# Altium PCB Gateway-Device-v1.0.PcbDoc (part 2 of 4)
Units mil, origin at the board's own origin, x right, y up, seen from the top; angles counter-clockwise.
Board outline 1968.5 x 3149.61 mil, 4 copper layers (Top Layer, Ground, Power, Bottom Layer), stack 61.654 mil thick; 142 components, 90 nets, 467 pads, 780 vias.
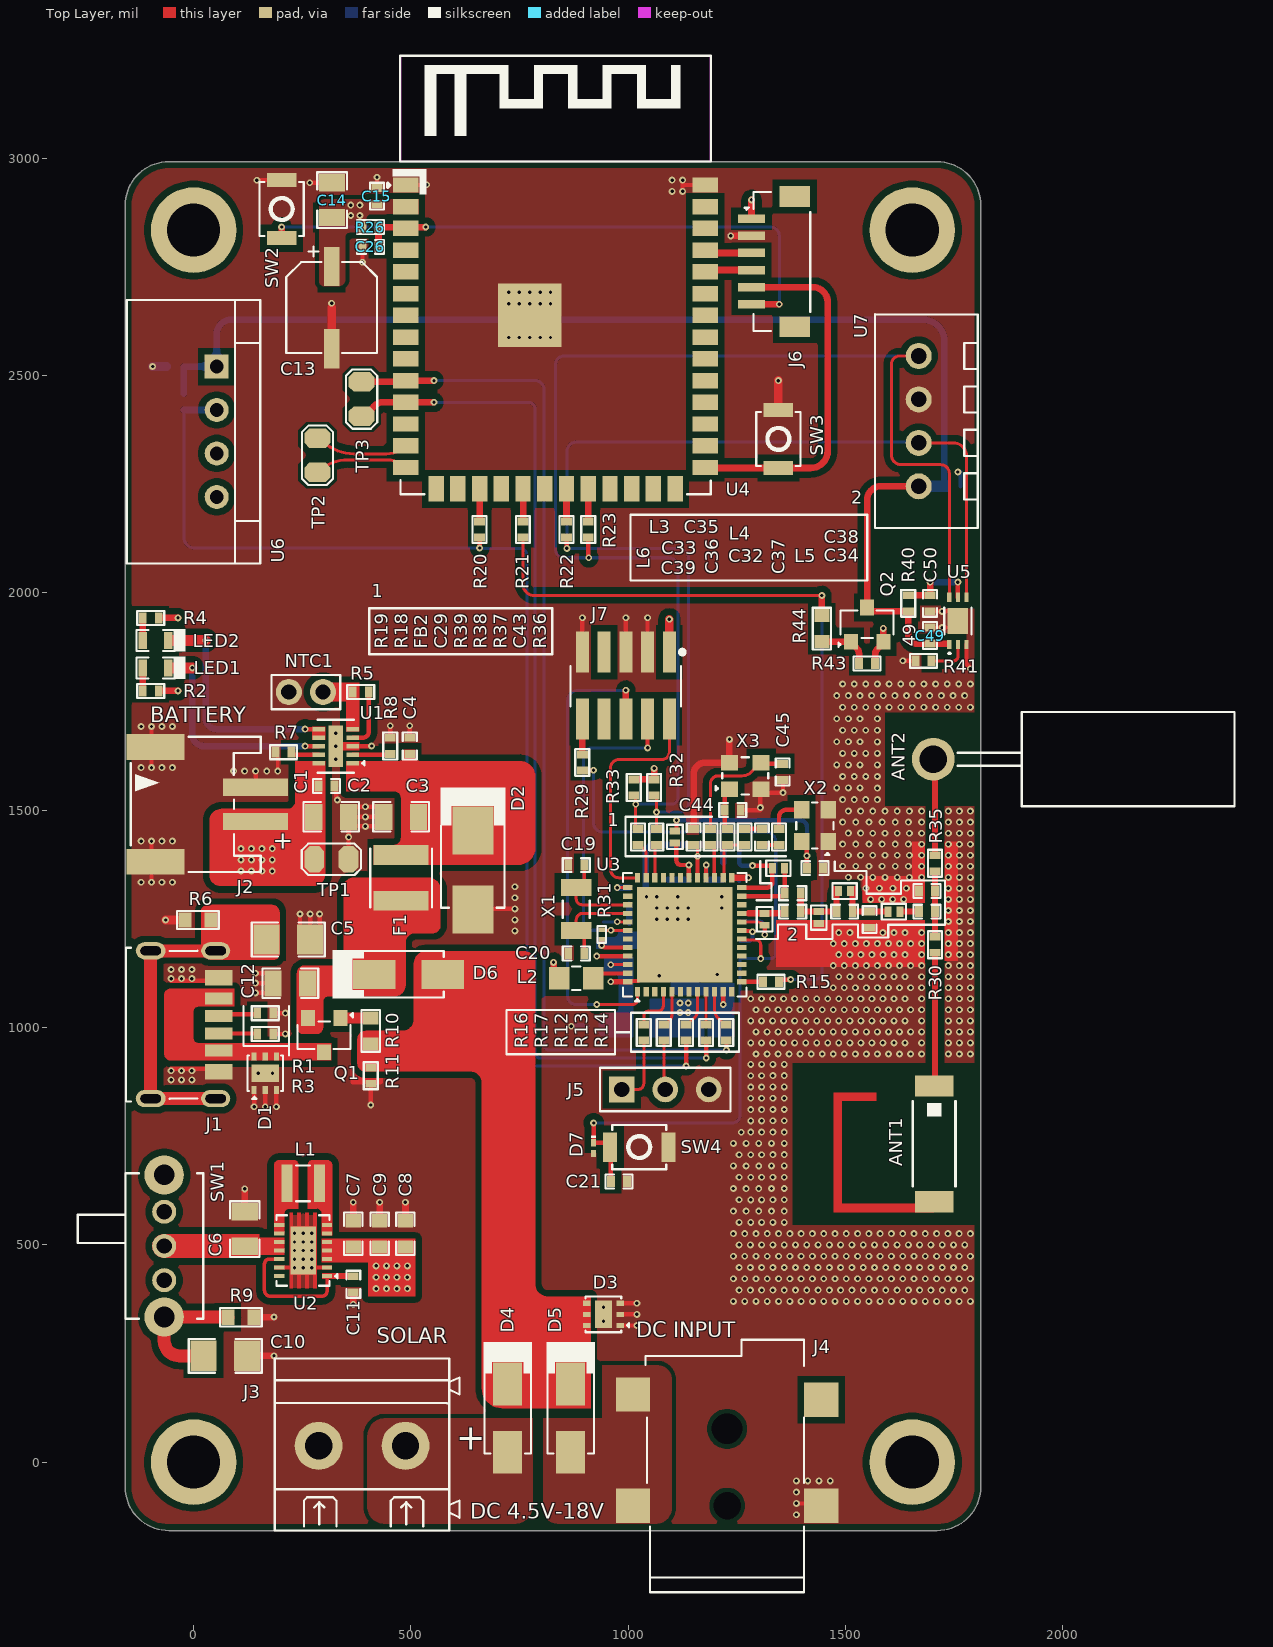
[diagram p0: Top Layer view]

## Part data (continued)
C43: library part GRM1555C1H100JA01D, "CAP CER 10PF 50V C0G/NP0 0402", Case Code (Imperial)=0402, Case Code (Metric)=1005, Dielectric=C0G, LCSC Part Number=C76946, Manufacturer=Murata, Max Operating Temperature=125°C, Min Operating Temperature=-55°C, Package Quantity=1, Tolerance=5%, Voltage=50V, Case/Package=0402, Category="Ceramic Capacitors", ComponentLink1Description=https://datasheet.ciiva.com/2989/product-2989280.pdf?src-supplier=Avnet, ComponentLink1URL=https://datasheet.ciiva.com/2989/product-2989280.pdf?src-supplier=Avnet, ComponentLink2Description=https://datasheet.ciiva.com/18184/getdatasheetpartid-307234-18184164.pdf?src-supplier=Verical, ComponentLink2URL=https://datasheet.ciiva.com/18184/getdatasheetpartid-307234-18184164.pdf?src-supplier=Verical, ComponentLink3Description=https://datasheet.ciiva.com/29200/453545-da-01-en-vs-kondensator-0402-29200107.pdf?src-supplier=Conrad, ComponentLink3URL=https://datasheet.ciiva.com/29200/453545-da-01-en-vs-kondensator-0402-29200107.pdf?src-supplier=Conrad, ComponentLink4Description=https://datasheet.ciiva.com/7828/1666664-7828812.pdf?src-supplier=Element14, ComponentLink4URL=https://datasheet.ciiva.com/7828/1666664-7828812.pdf?src-supplier=Element14, ComponentLink5Description=https://datasheet.ciiva.com/6271/partnumbering-e-01-6271159.pdf?src-supplier=Digi-Key, ComponentLink5URL=https://datasheet.ciiva.com/6271/partnumbering-e-01-6271159.pdf?src-supplier=Digi-Key, ComponentLink6Description=https://datasheet.ciiva.com/6271/partnumbering-e-01-6271158.pdf?src-supplier=Digi-Key, ComponentLink6URL=https://datasheet.ciiva.com/6271/partnumbering-e-01-6271158.pdf?src-supplier=Digi-Key, ComponentLink7Description=https://datasheet.ciiva.com/6271/partnumbering-e-01-6271068.pdf?src-supplier=Digi-Key, ComponentLink7URL=https://datasheet.ciiva.com/6271/partnumbering-e-01-6271068.pdf?src-supplier=Digi-Key, Construction=Flat, Depth=0.5mm, Height=0.5mm, Item Type=Capacitor, Lead Free="Lead Free", Length=1mm, Manufacturer Part Number=GRM1555C1H100JA01D, Material=Ceramic, Mounting Technology="Surface Mount", Packaging="Tape and Reel", Pricing="10000=0.0034, 50000=0.0027, 100000=0.0023, 250000=0.0021 (USD)", Radiation Hardening=No, Reach SVHC Compliant=No, RoHS=Yes, RoHS Compliant=Yes, Series=GRM, Stock=3860000, Supplier="Arrow Electronics", Supplier Part Number=GRM1555C1H100JA01D, Termination=SMD/SMT, Thickness=0.022inch, Voltage Rating=50V, Voltage Rating (DC)=50V, Width=0.02inch
C44 C45: library part CQ0402CRNPO9BN9R0, "CAP CER 9PF 50V C0G/NPO 0402", Case/Package=0402, LCSC Part Number=C577403, Manufacturer=Yageo, Max Operating Temperature=125°C, Min Operating Temperature=-55°C, Supplier Part Number=CQ0402CRNPO9BN9R0-ND, Voltage Rating=50V, Category="Ceramic Capacitors", ComponentLink1Description=http://www.yageo.com/documents/recent/UPY-High%20Q_NP0_16V-to-250V_13.pdf?src-supplier=Digikey, ComponentLink1URL=http://www.yageo.com/documents/recent/UPY-High%20Q_NP0_16V-to-250V_13.pdf?src-supplier=Digikey, Item Type=Capacitor, Manufacturer Part Number=CQ0402CRNPO9BN9R0, Mounting Technology="Surface Mount", Packaging="Tape and Reel", Pricing="10000=0.02594 (USD)", RoHS=Yes, Series=CQ, Supplier=Digikey
C46: library part GJM1555C1H4R3BB01D, "CAP CER 4.3PF 50V C0G/NP0 0402", Case Code (Imperial)=0402, Case Code (Metric)=1005, Dielectric=C0G, LCSC Part Number=C426034, Manufacturer=Murata, Max Operating Temperature=125°C, Min Operating Temperature=-55°C, Package Quantity=1, Temperature Coefficient=30ppm/°C, Voltage Rating=50V, Case/Package=0402, ComponentLink1Description=https://datasheet.ciiva.com/11613/product-11613476.pdf?src-supplier=Avnet, ComponentLink1URL=https://datasheet.ciiva.com/11613/product-11613476.pdf?src-supplier=Avnet, ComponentLink2Description=https://datasheet.ciiva.com/29536/partnumbering-e-01-29536086.pdf?src-supplier=Digikey, ComponentLink2URL=https://datasheet.ciiva.com/29536/partnumbering-e-01-29536086.pdf?src-supplier=Digikey, ComponentLink3Description=https://datasheet.ciiva.com/29536/partnumbering-e-01-29536085.pdf?src-supplier=Digikey, ComponentLink3URL=https://datasheet.ciiva.com/29536/partnumbering-e-01-29536085.pdf?src-supplier=Digikey, Construction=Flat, Depth=0.5mm, Height=0.5mm, Item Type=Capacitors, Length=1mm, Manufacturer Part Number=GJM1555C1H4R3BB01D, Material=4241ConductorMaterial, Mounting Technology="Surface Mount", Packaging="Tape and Reel", Pricing="1=0.1, 10=0.05, 50=0.05, 100=0.03, 1000=0.021, 10000=0.011 (USD)", Radiation Hardening=No, RoHS=Yes, RoHS Compliant=Yes, Series=GJM, Stock=11754, Supplier=Mouser, Termination=SMD/SMT, Thickness=0.022inch, Voltage Rating (DC)=50V, Width=0.02inch
D1: "9.5V 400W 7.5V 5V WSON-6(2x2) ESD and Surge Protection (TVS/ESD) ROHS", LCSC Part Number=C609571, Manufacturer="Texas Instruments", ComponentLink1Description=http://www.ti.com/lit/ds/symlink/tvs0500.pdf?src-supplier=Farnell, ComponentLink1URL=http://www.ti.com/lit/ds/symlink/tvs0500.pdf?src-supplier=Farnell, ComponentLink2Description=http://www.ti.com/lit/ds/symlink/tvs0500.pdf?src-supplier=Digikey, ComponentLink2URL=http://www.ti.com/lit/ds/symlink/tvs0500.pdf?src-supplier=Digikey, Item Type="TVS Diodes", Manufacturer Part Number=TVS0500DRVR, Pricing="1=0.51, 10=0.373, 100=0.254, 500=0.199, 1000=0.178 (USD)", RoHS=Yes, Stock=3745, Supplier=Digikey
D2: "Independent 5W 18V SMB Zener Diodes ROHS", LCSC Part Number=C18547762, Manufacturer=MSKSEMI, Package=SMB, ComponentLink1Description=LCSC, ComponentLink1URL=https://lcsc.com/product-detail/Zener-Diodes_MSKSEMI-SMBJ5355B-MS_C18547762.html, Item Type=Diode, Manufacturer Part Number=SMBJ5355B-MS
D3: "1 Surface Mount WSON-6(2x2) Surge Protection Devices (SPDs) ROHS", LCSC Part Number=C2649846, Manufacturer="Texas Instruments", ComponentLink1Description=http://www.ti.com/general/docs/suppproductinfo.tsp?distId=10&amp;gotoUrl=http%3A%2F%2Fwww.ti.com%2Flit%2Fgpn%2Ftvs1800&src-supplier=Digikey, ComponentLink1URL=http://www.ti.com/general/docs/suppproductinfo.tsp?distId=10&amp;gotoUrl=http%3A%2F%2Fwww.ti.com%2Flit%2Fgpn%2Ftvs1800&src-supplier=Digikey, Height=800um, Item Type="ESD Diode", Length=2mm, Manufacturer Part Number=TVS1800DRVR, Pins=6NUMBER, Pricing="1=0.5, 10=0.388, 50=0.388, 100=0.294, 1000=0.227, 10000=0.185 (USD)", RoHS=Yes, Stock=5073, Supplier=Mouser, Thickness=750um, Width=2mm
D4 D5 D6: "40V 500mV@2A 2A SMA(DO-214AC) Schottky Barrier Diodes (SBD) ROHS", LCSC Part Number=C2886579, Manufacturer="Guangdong Hottech", Package=SMA(DO-214AC), ComponentLink1Description=LCSC, ComponentLink1URL=https://www.lcsc.com/product-detail/Schottky-Barrier-Diodes-SBD_Guangdong-Hottech-SS24A_C2886579.html, Manufacturer Part Number=SS24A
D7: "TVS DIODE 3VWM ST0201", Breakdown Voltage=6.1V, Case Code (Imperial)=0201, Case Code (Metric)=0603, Clamping Voltage=12.2V, Leakage Current=100nA, Manufacturer=STMicroelectronics, Max Breakdown Voltage=8V, Max Operating Temperature=125°C, Max Power Dissipation=20W, Min Operating Temperature=-40°C, Peak Pulse Current=2A, Power Line Protection=No, Reverse Standoff Voltage=3V, Supplier Part Number=3110124, Test Current=1mA, Case/Package=0201, Category="TVS Diodes", ComponentLink1Description=https://datasheet.ciiva.com/1276/1684876-1276912.pdf?src-supplier=Element14, ComponentLink1URL=https://datasheet.ciiva.com/1276/1684876-1276912.pdf?src-supplier=Element14, ComponentLink2Description=https://datasheet.ciiva.com/4507/cd00212838-88488-4507763.pdf?src-supplier=Mouser, ComponentLink2URL=https://datasheet.ciiva.com/4507/cd00212838-88488-4507763.pdf?src-supplier=Mouser, ComponentLink3Description=https://datasheet.ciiva.com/16205/cd00212838-16205762.pdf?src-supplier=Future+Electronics, ComponentLink3URL=https://datasheet.ciiva.com/16205/cd00212838-16205762.pdf?src-supplier=Future+Electronics, ComponentLink4Description=https://datasheet.ciiva.com/15143/getdatasheetpartid-185245-15143908.pdf?src-supplier=Verical, ComponentLink4URL=https://datasheet.ciiva.com/15143/getdatasheetpartid-185245-15143908.pdf?src-supplier=Verical, ComponentLink5Description=https://datasheet.ciiva.com/22695/1684876-22695674.pdf?src-supplier=Element14, ComponentLink5URL=https://datasheet.ciiva.com/22695/1684876-22695674.pdf?src-supplier=Element14, ComponentLink6Description=https://datasheet.ciiva.com/337/cd00212838-337652.pdf?src-supplier=Digikey, ComponentLink6URL=https://datasheet.ciiva.com/337/cd00212838-337652.pdf?src-supplier=Digikey, ComponentLink7Description=https://datasheet.ciiva.com/337/cd00212838-337651.pdf?src-supplier=Digikey, ComponentLink7URL=https://datasheet.ciiva.com/337/cd00212838-337651.pdf?src-supplier=Digikey, ComponentLink8Description=https://datasheet.ciiva.com/337/cd00212838-337653.pdf?src-supplier=Digikey, ComponentLink8URL=https://datasheet.ciiva.com/337/cd00212838-337653.pdf?src-supplier=Digikey, ComponentLink9Description=https://datasheet.ciiva.com/11193/cd00212838-11193350.pdf?src-supplier=Avnet, ComponentLink9URL=https://datasheet.ciiva.com/11193/cd00212838-11193350.pdf?src-supplier=Avnet, ComponentLink10Description=https://datasheet.ciiva.com/41443/001184301-da-01-en-transil-sgl-un-esdalc6v1-1u2-st-0201-stm-41443159.pdf?src-supplier=Conrad, ComponentLink10URL=https://datasheet.ciiva.com/41443/001184301-da-01-en-transil-sgl-un-esdalc6v1-1u2-st-0201-stm-41443159.pdf?src-supplier=Conrad, Depth=0.3mm, Diode Type=ZENER, Direction=Unidirectional, ESD Protection=Yes, Height=0.33mm, Lead Free="Lead Free", Length=0.6mm, Manufacturer Part Number=ESDALC6V1-1U2, Max Reverse Leakage Current=100nA, Min Breakdown Voltage=6.1V, Mounting Technology="Surface Mount", Number of Channels=1, Number of Elements=1, Number of Unidirectional Channels=1, Packaging="Tape and Reel", Peak Pulse Power=20W, Pins=2, Polarity=Unidirectional, Power Dissipation=20W, Pricing="15000=0.0377, 45000=0.0364, 60000=0.0361, 150000=0.0351, 225000=0.0341 (USD)", Radiation Hardening=No, Reach SVHC Compliant=No, Reverse Breakdown Voltage=6.1V, RoHS=Yes, RoHS Compliant=Yes, Series="ESDA, TRANSIL™", Stock=405000, Supplier="Future Electronics", Termination=SMD/SMT, Width=0.35mm
F1: "24V 750mA 100A 1.5A 1210 Resettable Fuses ROHS", Current Rating=100A, LCSC Part Number=C207045, Manufacturer=Littlefuse, Supplier Part Number=F4146CT-ND, Voltage Rating=24V, Category="PTC Resettable Fuses", ComponentLink1Description=https://datasheet.ciiva.com/8005/littelfuse-ptc-1210l-8005372.pdf?src-supplier=Element14, ComponentLink1URL=https://datasheet.ciiva.com/8005/littelfuse-ptc-1210l-8005372.pdf?src-supplier=Element14, ComponentLink2Description=https://datasheet.ciiva.com/326/littelfuse-ptc-1210l-326060.pdf?src-supplier=Digikey, ComponentLink2URL=https://datasheet.ciiva.com/326/littelfuse-ptc-1210l-326060.pdf?src-supplier=Digikey, ComponentLink3Description=https://datasheet.ciiva.com/326/littelfuse-ptc-1210l-326061.pdf?src-supplier=Digikey, ComponentLink3URL=https://datasheet.ciiva.com/326/littelfuse-ptc-1210l-326061.pdf?src-supplier=Digikey, ComponentLink4Description=https://datasheet.ciiva.com/326/littelfuse-ptc-1210l-326062.pdf?src-supplier=Digikey, ComponentLink4URL=https://datasheet.ciiva.com/326/littelfuse-ptc-1210l-326062.pdf?src-supplier=Digikey, Height=1.8mm, Item Type=Fuse, Lead Free=5697LeadFree, Manufacturer Part Number=1210L075/24PR, Pricing="1=0.98, 5=0.81, 10=0.747, 50=0.6196, 100=0.5716, 250=0.51376, 500=0.47378, 1000=0.43676 (USD)", RoHS=Yes, Stock=2300, Supplier=Digikey
FB1: "500mΩ ±25% 600Ω@100MHz 0603 Ferrite Beads ROHS", Current Rating=350mA, DC Resistance (DCR)=500mR, LCSC Part Number=C141723, Manufacturer="Tai Tech", Height=800um, Impedance=600R, Item Type="Ferrite Bead", Length=1.6mm, Manufacturer Part Number=FCM1608KF-601T03, Number of Circuits=1NUMBER, Pricing="1=0.1, 10=0.02, 25=0.0176, 50=0.0158, 100=0.0142, 250=0.01236, 500=0.01106, 1000=0.00986 (USD)", Reach SVHC Compliant=4188SVHC, RoHS=No, Supplier=Digikey, Width=800um
FB2: "FERRITE BEAD 1 KOHM 0402 1LN", Case Code (Imperial)=0402, Case Code (Metric)=1005, Current Rating=250mA, DC Resistance (DCR)=1.1R, Frequency=100MHz, LCSC Part Number=C76889, Manufacturer=Murata, Max Operating Temperature=125°C, Min Operating Temperature=-55°C, Package Quantity=1, Tolerance=25%, Case/Package=0402, ComponentLink1Description=https://datasheet.ciiva.com/11799/0900766b811b5866-11799183.pdf?src-supplier=Rs, ComponentLink1URL=https://datasheet.ciiva.com/11799/0900766b811b5866-11799183.pdf?src-supplier=Rs, ComponentLink2Description=https://datasheet.ciiva.com/18089/getdatasheetpartid-153017-18089624.pdf?src-supplier=Verical, ComponentLink2URL=https://datasheet.ciiva.com/18089/getdatasheetpartid-153017-18089624.pdf?src-supplier=Verical, ComponentLink3Description=https://datasheet.ciiva.com/41449/001172203-da-01-en-drossel-0402-1000r-21-0x0-5mm-10000st-41449490.pdf?src-supplier=Conrad, ComponentLink3URL=https://datasheet.ciiva.com/41449/001172203-da-01-en-drossel-0402-1000r-21-0x0-5mm-10000st-41449490.pdf?src-supplier=Conrad, ComponentLink4Description=https://datasheet.ciiva.com/29347/442241-da-01-en-chip-drossel-0402-1000r-250ma-1-0x0-5mm-29347884.pdf?src-supplier=Conrad, ComponentLink4URL=https://datasheet.ciiva.com/29347/442241-da-01-en-chip-drossel-0402-1000r-250ma-1-0x0-5mm-29347884.pdf?src-supplier=Conrad, ComponentLink5Description=https://datasheet.ciiva.com/1466/5168-1466915.pdf?src-supplier=Element14, ComponentLink5URL=https://datasheet.ciiva.com/1466/5168-1466915.pdf?src-supplier=Element14, ComponentLink6Description=https://datasheet.ciiva.com/1466/5168-1466916.pdf?src-supplier=Element14, ComponentLink6URL=https://datasheet.ciiva.com/1466/5168-1466916.pdf?src-supplier=Element14, ComponentLink7Description=https://datasheet.ciiva.com/1012/l0110s0101blm15h-1012789.pdf?src-supplier=Digikey, ComponentLink7URL=https://datasheet.ciiva.com/1012/l0110s0101blm15h-1012789.pdf?src-supplier=Digikey, ComponentLink8Description=https://datasheet.ciiva.com/1012/l0110s0101blm15h-1012788.pdf?src-supplier=Digikey, ComponentLink8URL=https://datasheet.ciiva.com/1012/l0110s0101blm15h-1012788.pdf?src-supplier=Digikey, ComponentLink9Description=https://datasheet.ciiva.com/1012/l0110s0101blm15h-1012790.pdf?src-supplier=Digikey, ComponentLink9URL=https://datasheet.ciiva.com/1012/l0110s0101blm15h-1012790.pdf?src-supplier=Digikey, Core Material=Ferrite, DC Current=250mA, DC Resistance-Max=1.1R, Depth=0.5mm, ESR=1.1R, Height=0.5mm, Impedance=1kR, Item Type="Ferrite Beads", Lead Free=5697LeadFree, Length=1mm, Manufacturer Part Number=BLM15HG102SN1D, Material=Steel,Ferrite, Max Current Rating=250mA, Max DC Current=250mA, Military Standard=Not, Number of Circuits=1NUMBER, Number of Lines=1, Packaging="Tape and Reel", Pins=2, Pricing="10000=0.0226 (USD)", Radiation Hardening=No, Reach SVHC Compliant=No, RMS Current (Irms)=250mA, RoHS=Yes, RoHS Compliant=Yes, Series=BLM15H, Shielding=202Shielding, Stock=520000, Supplier="Arrow Electronics", Termination=SMD/SMT, Test Frequency=100MHz, Width=0.5mm
J1: "Receptacle USB - Type C 6 - USB Connectors ROHS", LCSC Part Number=C283540, Manufacturer="Koren Hroparts Elec", Manufacturer Part Number=Type-C-31-M-17, ComponentLink1Description=LCSC, ComponentLink1URL=https://www.lcsc.com/product-detail/USB-Connectors_Korean-Hroparts-Elec-TYPE-C-31-M-17_C283540.html, Item Type=Connector
J2: "CONN HEADER SMD R/A 2POS 2MM", Color=46,47Colour, Contact Resistance=20mR, Current Rating=3A, Flammability Rating="UL94 V-0", Housing Color=50Colour, Insulation Color=Natural, Insulation Resistance=1GR, LCSC Part Number=C295747, Manufacturer=JST, Max Current Rating=2A, Max Operating Temperature=85°C, Max Voltage Rating (AC)=100V, Min Operating Temperature=-25°C, ComponentLink1Description=http://www.farnell.com/datasheets/1699381.pdf?src-supplier=Farnell, ComponentLink1URL=http://www.farnell.com/datasheets/1699381.pdf?src-supplier=Farnell, ComponentLink2Description=http://datasheet.octopart.com/S2B-PH-SM4-TB-%28LF%29%28SN%29-JST-datasheet-12510261.pdf?src-supplier=Distrelec, ComponentLink2URL=http://datasheet.octopart.com/S2B-PH-SM4-TB-%28LF%29%28SN%29-JST-datasheet-12510261.pdf?src-supplier=Distrelec, ComponentLink3Description=http://www.farnell.com/datasheets/1699381.pdf?src-supplier=Newark, ComponentLink3URL=http://www.farnell.com/datasheets/1699381.pdf?src-supplier=Newark, ComponentLink4Description=https://datasheet.octopart.com/S2B-PH-SM4-TB%28LF%29%28SN%29-JST-datasheet-56537.pdf?src-supplier=Future+Electronics, ComponentLink4URL=https://datasheet.octopart.com/S2B-PH-SM4-TB%28LF%29%28SN%29-JST-datasheet-56537.pdf?src-supplier=Future+Electronics, ComponentLink5Description=http://www.farnell.com/datasheets/1699381.pdf?src-supplier=Element14, ComponentLink5URL=http://www.farnell.com/datasheets/1699381.pdf?src-supplier=Element14, ComponentLink6Description=https://datasheet.octopart.com/S2B-PH-SM4-TB-%28LF%29%28SN%29-JST-datasheet-12510261.pdf?src-supplier=TME, ComponentLink6URL=https://datasheet.octopart.com/S2B-PH-SM4-TB-%28LF%29%28SN%29-JST-datasheet-12510261.pdf?src-supplier=TME, Connector Type=Header, Contact Finish - Mating=TIN, Contact Material="Copper Alloy", Contact Mating Length=3.302mm, Contact Plating=154ConductorMaterial, Contact Shape=Square, Contact Type="Male Pin", Depth=7.6mm, Fastening Type=Detent, Gender=29Gender, Height=6mm, Housing Material=4302ConductorMaterial, Insulation Material=Nylon, Item Type=Connectors, Lead Free=5697LeadFree, Lead Pitch=2mm, Length=11.9mm, Manufacturer Part Number=S2B-PH-SM4-TB(LF)(SN), Mounting Technology="Surface Mount", Number of Contacts=2NUMBER, Number of Poles=2NUMBER, Number of Positions=2, Number of Rows=1, Orientation=5496OrientationType, Packaging="Cut Tape", Pins=2NUMBER, Pitch=2mm, Pricing="1000=0.27, 2000=0.265, 3000=0.265, 4000=0.26, 5000=0.25 (USD)", Reach SVHC Compliant=4186SVHC, RoHS=No, Series=PH, Stock=5000, Supplier="Future Electronics", Termination=Solder, Voltage Rating=100V, Voltage Rating (AC)=100V, Voltage Rating (DC)=100V, Weight=28.349523g, Width=2.34mm, Working Voltage=100V
J3: "1x2P 18A -40℃~+105℃ 250V Green 12~30 Straight 5.08mm 2.5 1 2 Plugin,P=5.08mm Screw terminal ROHS", LCSC Part Number=C395868, Manufacturer=DORABO, Package=Plugin,P=5.08mm, ComponentLink1Description=LCSC, ComponentLink1URL=https://www.lcsc.com/product-detail/Screw-terminal_DORABO-DB128L-5-08-2P-GN-S_C395868.html, Item Type="Terminal Block", Manufacturer Part Number=DB128L-5.08-2P-GN-S
J4: "Surface Mount DC Power Receptacle -20℃~+70℃ 2mm 6.4mm 2A 30V SMD AC/DC Power Connectors ROHS", LCSC Part Number=C720582, Manufacturer=XUNPU, Package=Custom, ComponentLink1Description=LCSC, ComponentLink1URL=https://www.lcsc.com/product-detail/AC-DC-Power-Connectors_XUNPU-DC-050-B200_C720582.html, Item Type="DC Jack", Manufacturer Part Number=DC-050-B200
J5: "Gold 250V 3A Straight Square Pins 2.5mm 3P 260℃ 6mm -40℃~+105℃ 3mm 2.54mm Plugin Black Brass 1x3P Plugin,P=2.54mm Pin Headers ROHS", LCSC Part Number=C706875, Manufacturer=XKB, Package=Plugin,P=2.54mm, ComponentLink1Description=LCSC, ComponentLink1URL=https://www.lcsc.com/product-detail/Pin-Headers_XKB-Connectivity-X6511WV-03H-C60D30_C706875.html, Item Type="Male Header", Manufacturer Part Number=X6511WV-03H-C60D30
J6: library part C145963, "1x6P SH 1 1mm 6 SMD,P=1mm Wire To Board / Wire To Wire Connector ROHS", Manufacturer=BOOMELE, Package=SMD,P=1mm, ComponentLink1Description=LCSC, ComponentLink1URL=https://www.lcsc.com/product-detail/Wire-To-Board-Wire-To-Wire-Connector_BOOMELE-Boom-Precision-Elec-C145963_C145963.html, Item Type=Connector, LCSC Part Number=C145963, Manufacturer Part Number=C145963
J7: "Gold 250V 1A Brick nogging Square Pins 1mm 10P 260℃ 4mm -40℃~+105℃ 1.27mm 双排 Black Brass 2x5P SMD,P=1.27mm Pin Headers ROHS", LCSC Part Number=C2881910, Manufacturer="XKB Connectivity", Package=SMD,P=1.27mm, ComponentLink1Description=LCSC, ComponentLink1URL=https://www.lcsc.com/product-detail/Pin-Headers_XKB-Connectivity-X1321WVS-2x05J-C40D53_C2881910.html, Item Type="Male Header", Manufacturer Part Number=X1321WVS-2x05J-C40D53
L1: library part DFE252012P-1R0M=P2, "FIXED IND 1UH 3.2A 0.042OHM SMD", Case Code (Imperial)=1008, Case Code (Metric)=2520, Current Rating=4.3A, DC Resistance (DCR)=42mR, Inductance Tolerance=20%, LCSC Part Number=C882955, Manufacturer=Murata, Manufacturer Part Number=DFE252012P-1R0M=P2, Max DC Current=3.2A, Max Operating Temperature=125°C, Min Operating Temperature=-40°C, Test Frequency=1MHz, Case/Package=1008, ComponentLink1Description=http://www.farnell.com/datasheets/2550134.pdf?src-supplier=Farnell, ComponentLink1URL=http://www.farnell.com/datasheets/2550134.pdf?src-supplier=Farnell, ComponentLink2Description=https://www.murata.com/~/media/webrenewal/products/inductor/chip/tokoproducts/wirewoundmetalalloychiptype/m_dfe252012p.ashx?src-supplier=Digikey, ComponentLink2URL=https://www.murata.com/~/media/webrenewal/products/inductor/chip/tokoproducts/wirewoundmetalalloychiptype/m_dfe252012p.ashx?src-supplier=Digikey, ComponentLink3Description=http://www.murata.com/~/media/webrenewal/products/inductor/chip/tokoproducts/wirewoundmetalalloychiptype/m_dfe252012p.ashx?src-supplier=Digikey, ComponentLink3URL=http://www.murata.com/~/media/webrenewal/products/inductor/chip/tokoproducts/wirewoundmetalalloychiptype/m_dfe252012p.ashx?src-supplier=Digikey, ComponentLink4Description=http://www.toko.co.jp/products/pdf/inductors/dfe252012p.pdf?src-supplier=Avnet, ComponentLink4URL=http://www.toko.co.jp/products/pdf/inductors/dfe252012p.pdf?src-supplier=Avnet, Core Material=Ferrite, Depth=2mm, ESR=42mR, Height=1.2mm, Height - Seated (Max)=0.039inch, Item Type=Inductor, Length=0.098inch, Mounting Technology="Surface Mount", Packaging="Cut Tape", Pricing="3000=0.103, 6000=0.1, 9000=0.0987, 12000=0.0976, 15000=0.0942 (USD)", RMS Current (Irms)=3.2A, RoHS=Yes, RoHS Compliant=Yes, Saturation Current=4.3A, Series=DFE252012P, Shielding=Shielded, Stock=30000, Supplier="Future Electronics", Tolerance=20%, Width=0.079inch
L2: library part MLZ2012M150WT000, "FIXED IND 15UH 250MA 950MOHM SMD", Case Code (Imperial)=0805, Case Code (Metric)=2012, DC Resistance (DCR)=950mR, LCSC Part Number=C383402, Manufacturer=TDK, Max Operating Temperature=125°C, Min Operating Temperature=-55°C, RMS Current (Irms)=250mA, Saturation Current=120mA, Self Resonant Frequency=40MHz, Test Frequency=2MHz, Tolerance=20%, Case/Package=0805, ComponentLink1Description=https://datasheet.ciiva.com/29690/inductor-commercial-decoupling-mlz-en-29690328.pdf?src-supplier=Digikey, ComponentLink1URL=https://datasheet.ciiva.com/29690/inductor-commercial-decoupling-mlz-en-29690328.pdf?src-supplier=Digikey, ComponentLink2Description=https://datasheet.ciiva.com/29690/inductor-commercial-decoupling-mlz-en-29690327.pdf?src-supplier=Digikey, ComponentLink2URL=https://datasheet.ciiva.com/29690/inductor-commercial-decoupling-mlz-en-29690327.pdf?src-supplier=Digikey, ComponentLink3Description=https://datasheet.ciiva.com/29690/inductor-commercial-decoupling-mlz-en-29690329.pdf?src-supplier=Digikey, ComponentLink3URL=https://datasheet.ciiva.com/29690/inductor-commercial-decoupling-mlz-en-29690329.pdf?src-supplier=Digikey, Core Material=Ferrite, ESR=1.235R, Height=1.45mm, Item Type="Fixed Inductors", Manufacturer Part Number=MLZ2012M150WT000, Mounting Technology="Surface Mount", Packaging="Cut Tape", Pricing="2000=0.0432, 10000=0.0391, 24000=0.037, 50000=0.0337 (USD)", RoHS=Yes, RoHS Compliant=Yes, Series=MLZ, Shielding=Shielded, Stock=144000, Supplier="Arrow Electronics"
L3: library part LQW15AN47NG00D, "FIXED IND 47NH 210MA 1.08OHM SMD", Case Code (Imperial)=0402, Case Code (Metric)=1005, Current=600mA, DC Current=210mA, DC Resistance (DCR)=1.08R, Inductance Tolerance=2%, LCSC Part Number=C22334, Manufacturer=Murata, Max Operating Temperature=125°C, Min Operating Temperature=-55°C, Package Quantity=1, Self Resonant Frequency=2.9GHz, Test Frequency=100MHz, Case/Package=0402, ComponentLink1Description=https://datasheet.ciiva.com/11799/0900766b8090d800-11799167.pdf?src-supplier=Rs, ComponentLink1URL=https://datasheet.ciiva.com/11799/0900766b8090d800-11799167.pdf?src-supplier=Rs, ComponentLink2Description=https://datasheet.ciiva.com/6709/l0075s0080lqw15a-00-6709897.pdf?src-supplier=Digikey, ComponentLink2URL=https://datasheet.ciiva.com/6709/l0075s0080lqw15a-00-6709897.pdf?src-supplier=Digikey, ComponentLink3Description=https://datasheet.ciiva.com/6709/l0075s0080lqw15a-00-6709899.pdf?src-supplier=Digikey, ComponentLink3URL=https://datasheet.ciiva.com/6709/l0075s0080lqw15a-00-6709899.pdf?src-supplier=Digikey, ComponentLink4Description=https://datasheet.ciiva.com/4976/product-4976502.pdf?src-supplier=Mouser, ComponentLink4URL=https://datasheet.ciiva.com/4976/product-4976502.pdf?src-supplier=Mouser, ComponentLink5Description=https://datasheet.ciiva.com/8507/l0075s0080lqw15a-00-8507529.pdf?src-supplier=Avnet, ComponentLink5URL=https://datasheet.ciiva.com/8507/l0075s0080lqw15a-00-8507529.pdf?src-supplier=Avnet, ComponentLink6Description=https://datasheet.ciiva.com/16455/l0075s0080lqw15a-00-16455878.pdf?src-supplier=Future+Electronics, ComponentLink6URL=https://datasheet.ciiva.com/16455/l0075s0080lqw15a-00-16455878.pdf?src-supplier=Future+Electronics, Core Material=Non-Magnetic,Air,Ferrite, Depth=0.6mm, ESR=1.08R, Height=0.5mm, Item Type="Fixed Inductors", Lead Free="Lead Free", Length=1mm, Manufacturer Part Number=LQW15AN47NG00D, Max DC Current=210mA, Military Standard=Not, Mounting Technology="Surface Mount", Packaging="Tape and Reel", Pins=2, Pricing="371=0.0431 (USD)", Q Factor=25, Reach SVHC Compliant=No, RMS Current (Irms)=210mA, RoHS=Yes, RoHS Compliant=Yes, Series=LQW15A_00, Shielding=Unshielded, Stock=371, Supplier="Arrow Electronics", Termination=SMD/SMT, Tolerance=2%, Weight=2.8E-05oz, Width=0.5mm
L4: library part LQW15AN3N3D10D, "FIXED IND 3.3NH 900MA 0.04OHM SM", Case Code (Imperial)=0402, Case Code (Metric)=1005, Current=800mA, Current Rating=900mA, DC Resistance (DCR)=40mR, LCSC Part Number=C98061, Manufacturer=Murata, Max Operating Temperature=125°C, Min Operating Temperature=-55°C, Package Quantity=1, Self Resonant Frequency=12GHz, Test Frequency=100MHz, Case/Package=0402, ComponentLink1Description=https://datasheet.ciiva.com/11799/0900766b8090d5c4-11799120.pdf?src-supplier=Rs, ComponentLink1URL=https://datasheet.ciiva.com/11799/0900766b8090d5c4-11799120.pdf?src-supplier=Rs, ComponentLink2Description=https://datasheet.ciiva.com/6705/l0075s0080lqw15a-10-6705512.pdf?src-supplier=Digikey, ComponentLink2URL=https://datasheet.ciiva.com/6705/l0075s0080lqw15a-10-6705512.pdf?src-supplier=Digikey, ComponentLink3Description=https://datasheet.ciiva.com/6705/l0075s0080lqw15a-10-6705511.pdf?src-supplier=Digikey, ComponentLink3URL=https://datasheet.ciiva.com/6705/l0075s0080lqw15a-10-6705511.pdf?src-supplier=Digikey, ComponentLink4Description=https://datasheet.ciiva.com/6705/l0075s0080lqw15a-10-6705513.pdf?src-supplier=Digikey, ComponentLink4URL=https://datasheet.ciiva.com/6705/l0075s0080lqw15a-10-6705513.pdf?src-supplier=Digikey, ComponentLink5Description=https://datasheet.ciiva.com/4976/product-4976988.pdf?src-supplier=Mouser, ComponentLink5URL=https://datasheet.ciiva.com/4976/product-4976988.pdf?src-supplier=Mouser, ComponentLink6Description=https://datasheet.ciiva.com/8506/l0075s0080lqw15a-10-8506007.pdf?src-supplier=Avnet, ComponentLink6URL=https://datasheet.ciiva.com/8506/l0075s0080lqw15a-10-8506007.pdf?src-supplier=Avnet, ComponentLink7Description=https://datasheet.ciiva.com/16455/l0075s0080lqw15a-10-16455870.pdf?src-supplier=Future+Electronics, ComponentLink7URL=https://datasheet.ciiva.com/16455/l0075s0080lqw15a-10-16455870.pdf?src-supplier=Future+Electronics, Core Material=Non-Magnetic,Air, DC Current=900mA, Depth=0.7mm, Height=0.5mm, Height - Seated (Max)=0.024inch, Item Type="Fixed Inductors", Lead Free="Lead Free", Length=1mm, Manufacturer Part Number=LQW15AN3N3D10D, Max Current Rating=900mA, Max DC Current=900mA, Military Standard=Not, Mounting Technology="Surface Mount", Packaging="Tape and Reel", Pins=2, Pricing="10000=0.0448 (USD)", Radiation Hardening=No, Reach SVHC Compliant=No, RoHS=Yes, RoHS Compliant=Yes, Series=LQW15A_10, Shielding=Unshielded, Stock=20000, Supplier="Arrow Electronics", Termination=SMD/SMT, Weight=2.8E-05oz, Width=0.02inch
L5: library part LQW15AN8N2G00D, "FIXED IND 8.2NH 540MA 0.14OHM SM", Case Code (Imperial)=0402, Case Code (Metric)=1005, DC Current=540mA, DC Resistance (DCR)=140mR, Inductance Tolerance=2%, LCSC Part Number=C84404, Manufacturer=Murata, Max Operating Temperature=125°C, Min Operating Temperature=-55°C, Package Quantity=1, Self Resonant Frequency=5.5GHz, Test Frequency=100MHz, Case/Package=0402, ComponentLink1Description=https://datasheet.ciiva.com/11799/0900766b8090d800-11799384.pdf?src-supplier=Rs, ComponentLink1URL=https://datasheet.ciiva.com/11799/0900766b8090d800-11799384.pdf?src-supplier=Rs, ComponentLink2Description=https://datasheet.ciiva.com/16455/l0075s0080lqw15a-00-16455832.pdf?src-supplier=Future+Electronics, ComponentLink2URL=https://datasheet.ciiva.com/16455/l0075s0080lqw15a-00-16455832.pdf?src-supplier=Future+Electronics, Core Material=Non-Magnetic,Ferrite, Depth=0.7mm, ESR=140mR, Height=0.5mm, Item Type="Fixed Inductors", Lead Free="Lead Free", Length=1mm, Manufacturer Part Number=LQW15AN8N2G00D, Max Current Rating=540mA, Max DC Current=540mA, Military Standard=Not, Mounting Technology="Surface Mount", Packaging="Tape and Reel", Pins=2, Pricing="1=0.11, 10=0.094, 50=0.094, 100=0.078, 1000=0.064, 10000=0.052 (USD)", Q Factor=25, Radiation Hardening=No, Reach SVHC Compliant=No, RMS Current (Irms)=540mA, RoHS=Yes, RoHS Compliant=Yes, Series=LQW15A_00, Shielding=Unshielded, Stock=47249, Supplier=Mouser, Termination=SMD/SMT, Tolerance=2%, Weight=2.8E-05oz, Width=0.5mm
L6: library part LQW15AN9N1G8ZD, "FIXED IND 9.1NH 1.4A 0.08OHM SMD", LCSC Part Number=C1330593, Manufacturer=Murata, ComponentLink1Description=https://search.murata.co.jp/Ceramy/image/img/P02/JELF243A-9138.pdf?src-supplier=Digikey, ComponentLink1URL=https://search.murata.co.jp/Ceramy/image/img/P02/JELF243A-9138.pdf?src-supplier=Digikey, ComponentLink2Description=https://datasheet.octopart.com/LQW15AN9N1G8ZD-Murata-datasheet-140317541.pdf?src-supplier=Farnell, ComponentLink2URL=https://datasheet.octopart.com/LQW15AN9N1G8ZD-Murata-datasheet-140317541.pdf?src-supplier=Farnell, Item Type="Fixed Inductors", Manufacturer Part Number=LQW15AN9N1G8ZD, Pricing="1=0.16, 10=0.134, 50=0.118, 100=0.111, 1000=0.091, 10000=0.074 (USD)", RoHS=Yes, Stock=16863, Supplier=Mouser
LED1: library part NCD0603R3, "RED LED 0603 Light Emitting Diodes", LCSC Part Number=C3151730, Manufacturer="Foshan NationStar Optoelectronics", Package=0603, ComponentLink1Description=LCSC, ComponentLink1URL=https://www.lcsc.com/product-detail/Light-Emitting-Diodes-LED_Foshan-NationStar-Optoelectronics-NCD0603R3_C3151730.html, Item Type=LED, Manufacturer Part Number=NCD0603R3
LED2: library part NCD0603G2, "Emerald 0603 Light Emitting Diodes (LED) ROHS", LCSC Part Number=C87326, Manufacturer="Foshan NationStar Optoelectronics", Package=0603, ComponentLink1Description=LCSC, ComponentLink1URL=https://www.lcsc.com/product-detail/Light-Emitting-Diodes-LED_Foshan-NationStar-Optoelectronics-NCD0603G2_C87326.html, Item Type=LED, Manufacturer Part Number=NCD0603G2
NTC1: library part "MF51B 103F3435", "10kΩ 50mW ±1% NTC Thermistors ROHS", LCSC Part Number=C394029, Manufacturer="Nanjing Shiheng Elec", ComponentLink1Description=LCSC, ComponentLink1URL=https://lcsc.com/product-detail/NTC-Thermistors_Nanjing-Shiheng-Elec-MF51B-103F3435_C394029.html, Item Type="NTC Thermistors", Manufacturer Part Number="MF51B 103F3435"
Q1: "MOSFET P-CH 30V 4.3A SOT23-3", LCSC Part Number=C3280149, Manufacturer="Alpha & Omega Semiconductor", Supplier Part Number=785-AOSS21311CCT-ND, Category=Transistors, Item Type=MOSFET, Manufacturer Part Number=AOSS21311C, Pricing="1=0.44, 10=0.314, 100=0.1582, 500=0.14016, 1000=0.10908 (USD)", RoHS=Yes, Stock=15013, Supplier=Digikey
Q2: "Trans Mosfet P-ch 30V 4A 3-PIN SOT-23 T/r", Case/Package=TO-236-3, Continuous Drain Current (ID)=4A, Drain to Source Voltage (Vdss)=30V, Input Capacitance=1.2nF, LCSC Part Number=C181091, Manufacturer="Alpha & Omega Semiconductor", Manufacturer Part Number=AO3401A, Max Operating Temperature=150°C, Max Power Dissipation=1.4W, Min Operating Temperature=-55°C, Category=MOSFETs, ComponentLink1Description=https://datasheet.ciiva.com/940/ao3401a-940720.pdf?src-supplier=Digi-Key, ComponentLink1URL=https://datasheet.ciiva.com/940/ao3401a-940720.pdf?src-supplier=Digi-Key, ComponentLink2Description=https://datasheet.ciiva.com/26927/getdatasheetpartid-79048-26927888.pdf?src-supplier=Verical, ComponentLink2URL=https://datasheet.ciiva.com/26927/getdatasheetpartid-79048-26927888.pdf?src-supplier=Verical, Item Type=Mosfet, Lead Free="Lead Free", Mount="Surface Mount", Number of Elements=1, Number of Pins=3, Packaging="Tape and Reel", Power Dissipation=1.4W, Radiation Hardening=No, Rds On Max=44mR, RoHS=Yes, RoHS Compliant=Yes, Series=-, Supplier 1="Arrow Electronics", Supplier Part Number 1=AO3401A
R1 R3: library part RC0402FR-075K1L, "RES 5.1K OHM 1% 1/16W 0402", Case Code (Imperial)=0402, Case Code (Metric)=1005, LCSC Part Number=C105872, Manufacturer=Yageo, Max Operating Temperature=155°C, Max Power Dissipation=63mW, Min Operating Temperature=-55°C, Package Quantity=1, Resistance=5.1kR, Resistance Tolerance=1%, Resistor Type="Thick Film", Temperature Coefficient=100ppm/°C, Voltage Rating=50V, Case/Package=0402, Category="Chip SMD Resistors", ComponentLink1Description=https://datasheet.ciiva.com/7983/1018594-7983519.pdf?src-supplier=Element14, ComponentLink1URL=https://datasheet.ciiva.com/7983/1018594-7983519.pdf?src-supplier=Element14, ComponentLink2Description=https://datasheet.ciiva.com/46394/1018594-46394936.pdf?src-supplier=Element14, ComponentLink2URL=https://datasheet.ciiva.com/46394/1018594-46394936.pdf?src-supplier=Element14, ComponentLink3Description=https://datasheet.ciiva.com/2453/pyu-r-int-thick-7-2453401.pdf?src-supplier=Digi-Key, ComponentLink3URL=https://datasheet.ciiva.com/2453/pyu-r-int-thick-7-2453401.pdf?src-supplier=Digi-Key, ComponentLink4Description=https://datasheet.ciiva.com/2453/pyu-r-int-thick-7-2453402.pdf?src-supplier=Digi-Key, ComponentLink4URL=https://datasheet.ciiva.com/2453/pyu-r-int-thick-7-2453402.pdf?src-supplier=Digi-Key, ComponentLink5Description=https://datasheet.ciiva.com/2453/pyu-r-int-thick-7-2453400.pdf?src-supplier=Digi-Key, ComponentLink5URL=https://datasheet.ciiva.com/2453/pyu-r-int-thick-7-2453400.pdf?src-supplier=Digi-Key, ComponentLink6Description=https://datasheet.ciiva.com/12558/pyu-rc0402-51-rohs-l-6-r-8721-12558460.pdf?src-supplier=Mouser, ComponentLink6URL=https://datasheet.ciiva.com/12558/pyu-rc0402-51-rohs-l-6-r-8721-12558460.pdf?src-supplier=Mouser, ComponentLink7Description=https://datasheet.ciiva.com/16744/pyu-rc0402-51-rohs-l-6-r-16744283.pdf?src-supplier=Future+Electronics, ComponentLink7URL=https://datasheet.ciiva.com/16744/pyu-rc0402-51-rohs-l-6-r-16744283.pdf?src-supplier=Future+Electronics, ComponentLink8Description=https://datasheet.ciiva.com/15189/getdatasheetpartid-323636-15189493.pdf?src-supplier=Verical, ComponentLink8URL=https://datasheet.ciiva.com/15189/getdatasheetpartid-323636-15189493.pdf?src-supplier=Verical, Construction=Rectangular, Depth=0.5mm, Features="Moisture Resistant", Height=0.016inch, Item Type=Resistor, Lead Free="Lead Free", Length=1mm, Manufacturer Part Number=RC0402FR-075K1L, Military Standard=Not, Number of Terminations=2, Packaging="Tape and Reel", Power Rating=63mW, Pricing 1="10000=0.00085 (USD)", RoHS=Yes, RoHS Compliant=Yes, Series=RC, Stock 1=65000, Supplier 1=Avnet, Supplier Part Number 1=RC0402FR-075K1L, Technology="THICK FILM", Termination=SMD/SMT, Tolerance=1%, Voltage Rating (DC)=50V, Width=0.02inch, Working Voltage=50V
R2 R4 R36: library part RC0402FR-07220RL, "RES 220 OHM 1% 1/16W 0402", Case Code (Imperial)=0402, Case Code (Metric)=1005, LCSC Part Number=C112291, Manufacturer=Yageo, Max Operating Temperature=155°C, Max Power Dissipation=63mW, Min Operating Temperature=-55°C, Package Quantity=1, Power Rating=62.5mW, Resistance Tolerance=1%, Resistor Type="Thick Film", Temperature Coefficient=100ppm/°C, Voltage Rating=50V, Case/Package=0402, ComponentLink1Description=https://datasheet.ciiva.com/2453/pyu-r-int-thick-7-2453461.pdf?src-supplier=Digikey, ComponentLink1URL=https://datasheet.ciiva.com/2453/pyu-r-int-thick-7-2453461.pdf?src-supplier=Digikey, Construction=Rectangular, Depth=0.5mm, Features="Moisture Resistant", Height=0.016inch, Item Type=Resistors, Lead Free=5697LeadFree, Length=0.039inch, Manufacturer Part Number=RC0402FR-07220RL, Military Standard=Not, Number of Terminations=2, Packaging="Tape and Reel", Pins=2, Pricing="1=0.1, 10=0.007, 100=0.0061, 1000=0.0051, 2500=0.00408 (USD)", Reach SVHC Compliant=No, RoHS=Yes, RoHS Compliant=Yes, Series=RC, Stock=225544, Supplier=Digikey, Technology="THICK FILM", Termination=SMD/SMT, Tolerance=1%, Voltage Rating (AC)=50V, Voltage Rating (DC)=50V, Width=0.02inch
R5: library part RT0402BRD0721K5L, "RES SMD 21.5KOHM 0.1% 1/16W 0402", Case Code (Imperial)=0402, Case Code (Metric)=1005, LCSC Part Number=C852636, Manufacturer=Yageo, Max Operating Temperature=155°C, Max Power Dissipation=63mW, Min Operating Temperature=-55°C, Package Quantity=10000, Power Rating=62.5mW, Temperature Coefficient=25ppm/°C, Tolerance=0.1%, Voltage Rating=50V, Case/Package=0402, ComponentLink1Description=https://datasheet.ciiva.com/2582/pyu-rt-1-to-0-05-rohs-l-5-2582228.pdf?src-supplier=Digikey, ComponentLink1URL=https://datasheet.ciiva.com/2582/pyu-rt-1-to-0-05-rohs-l-5-2582228.pdf?src-supplier=Digikey, ComponentLink2Description=https://datasheet.ciiva.com/12725/pyu-rt-1-to-0-05-rohs-l-4-12725964.pdf?src-supplier=Mouser, ComponentLink2URL=https://datasheet.ciiva.com/12725/pyu-rt-1-to-0-05-rohs-l-4-12725964.pdf?src-supplier=Mouser, Height=0.014inch, Item Type=Resistor, Lead Free="Lead Free", Length=0.039inch, Manufacturer Part Number=RT0402BRD0721K5L, Number of Terminations=2, Packaging="Tape and Reel", Pricing="1=0.16, 10=0.121, 50=0.0958, 100=0.0859, 500=0.0654, 1000=0.0578, 5000=0.04283 (USD)", RoHS=Yes, RoHS Compliant=Yes, Series=RT, Stock=19982, Supplier=Digikey, Termination=SMD/SMT, Voltage Rating (DC)=50V, Width=0.02inch
R6 R9: library part RC0603FR-071ML, "RES SMD 1M OHM 1% 1/10W 0603", Case Code (Imperial)=0603, Case Code (Metric)=1608, LCSC Part Number=C105578, Manufacturer=Yageo, Max Operating Temperature=155°C, Min Operating Temperature=-55°C, Package Quantity=5000, Power Rating=100mW, Resistance=1MR, Supplier Part Number 1=311-1.00MHRDKR-ND, Temperature Coefficient=100ppm/°C, Tolerance=1%, Voltage Rating=50V, Case/Package=0603, ComponentLink1Description=http://www.farnell.com/datasheets/2167052.pdf?src-supplier=Mouser, ComponentLink1URL=http://www.farnell.com/datasheets/2167052.pdf?src-supplier=Mouser, ComponentLink2Description=http://www.farnell.com/datasheets/2167052.pdf?src-supplier=Element14, ComponentLink2URL=http://www.farnell.com/datasheets/2167052.pdf?src-supplier=Element14, ComponentLink3Description=http://documents.rs-components.com/techlib://itc_doclist_GB.htm?stockno=5048956&src-supplier=RSComponents, ComponentLink3URL=http://documents.rs-components.com/techlib://itc_doclist_GB.htm?stockno=5048956&src-supplier=RSComponents, Composition="Thick Film", Depth=0.8mm, Height=0.45mm, Item Type=Resistor, Lead Free="Lead Free", Length=1.6mm, Manufacturer Part Number=RC0603FR-071ML, Military Standard=Not, Number of Pins=2, Packaging="Tape and Reel", Pricing 1="1=0.1, 10=0.023, 100=0.0094, 1000=0.00421, 2500=0.00366 (USD)", REACH SVHC="No SVHC", Stock 1=3824601, Supplier 1=Digi-Key, Termination=SMD/SMT, Voltage Rating (DC)=50V, Width=0.8mm
R7: library part RT0402BRD076K98L, "RES SMD 6.98KOHM 0.1% 1/16W 0402", Case Code (Imperial)=0402, Case Code (Metric)=1005, LCSC Part Number=C852901, Manufacturer=Yageo, Max Operating Temperature=155°C, Max Power Dissipation=63mW, Min Operating Temperature=-55°C, Package Quantity=10000, Power Rating=62.5mW, Supplier Part Number 1=2098961, Temperature Coefficient=25ppm/°C, Tolerance=0.1%, Voltage Rating=50V, Case/Package=0402, Category="Chip SMD Resistors", ComponentLink1Description=https://datasheet.ciiva.com/2582/pyu-rt-1-to-0-05-rohs-l-4-2582483.pdf?src-supplier=Digi-Key, ComponentLink1URL=https://datasheet.ciiva.com/2582/pyu-rt-1-to-0-05-rohs-l-4-2582483.pdf?src-supplier=Digi-Key, ComponentLink2Description=https://datasheet.ciiva.com/46635/pyu-rt-1-to-0-05-rohs-l-5-46635214.pdf?src-supplier=Digi-Key, ComponentLink2URL=https://datasheet.ciiva.com/46635/pyu-rt-1-to-0-05-rohs-l-5-46635214.pdf?src-supplier=Digi-Key, Height=0.014inch, Item Type=Resistor, Lead Free="Lead Free", Length=0.039inch, Manufacturer Part Number=RT0402BRD076K98L, Number of Terminations=2, Packaging="Tape and Reel", Pricing 1="1=0.173, 20=0.129, 150=0.0997, 1000=0.0719, 5000=0.0482 (USD)", RoHS=Yes, RoHS Compliant=Yes, Series=RT, Stock 1=9500, Supplier 1="Future Electronics", Termination=SMD/SMT, Voltage Rating (DC)=50V, Weight=2.3E-05oz, Width=0.5mm
R8: library part RT0402BRD07536RL, "RES SMD 536 OHM 0.1% 1/16W 0402", Case Code (Imperial)=0402, Case Code (Metric)=1005, LCSC Part Number=C852834, Manufacturer=Yageo, Max Operating Temperature=155°C, Max Power Dissipation=63mW, Min Operating Temperature=-55°C, Package Quantity=10000, Power Rating=62.5mW, Temperature Coefficient=25ppm/°C, Tolerance=0.1%, Voltage Rating=50V, Case/Package=0402, ComponentLink1Description=https://datasheet.ciiva.com/2582/pyu-rt-1-to-0-05-rohs-l-4-2582421.pdf?src-supplier=Digikey, ComponentLink1URL=https://datasheet.ciiva.com/2582/pyu-rt-1-to-0-05-rohs-l-4-2582421.pdf?src-supplier=Digikey, ComponentLink2Description=https://datasheet.ciiva.com/46635/pyu-rt-1-to-0-05-rohs-l-5-46635191.pdf?src-supplier=Digikey, ComponentLink2URL=https://datasheet.ciiva.com/46635/pyu-rt-1-to-0-05-rohs-l-5-46635191.pdf?src-supplier=Digikey, ComponentLink3Description=https://datasheet.ciiva.com/12799/pyu-rt-1-to-0-05-rohs-l-4-12799465.pdf?src-supplier=Mouser, ComponentLink3URL=https://datasheet.ciiva.com/12799/pyu-rt-1-to-0-05-rohs-l-4-12799465.pdf?src-supplier=Mouser, Features="Moisture Resistant", Height=0.014inch, Item Type=Resistors, Lead Free="Lead Free", Length=0.039inch, Manufacturer Part Number=RT0402BRD07536RL, Number of Terminations=2, Packaging="Tape and Reel", Pricing="1=0.1, 10=0.074, 50=0.0652, 100=0.0615, 500=0.05402, 1000=0.0512, 5000=0.04567 (USD)", RoHS=Yes, RoHS Compliant=Yes, Series=RT, Stock=26324, Supplier=Digikey, Termination=SMD/SMT, Voltage Rating (DC)=50V, Weight=2.3E-05oz, Width=0.5mm
R10 R44: library part RC0603FR-0710RL, "RES SMD 10 OHM 1% 1/10W 0603", Case Code (Imperial)=0603, Case Code (Metric)=1608, LCSC Part Number=C109318, Manufacturer=Yageo, Max Operating Temperature=155°C, Min Operating Temperature=-55°C, Power Rating=100mW, Supplier Part Number 1=311-10.0HRDKR-ND, Temperature Coefficient=200ppm/°C, Tolerance=1%, Voltage Rating=50V, Case/Package=0603, ComponentLink1Description=http://www.farnell.com/datasheets/1868787.pdf?src-supplier=Element14, ComponentLink1URL=http://www.farnell.com/datasheets/1868787.pdf?src-supplier=Element14, ComponentLink2Description=http://www.yageo.com/documents/recent/PYu-RC0603_51_RoHS_L_4.pdf?src-supplier=Avnet, ComponentLink2URL=http://www.yageo.com/documents/recent/PYu-RC0603_51_RoHS_L_4.pdf?src-supplier=Avnet, ComponentLink3Description=http://documents.rs-components.com/techlib://itc_doclist_GB.htm?stockno=5048984&src-supplier=RSComponents, ComponentLink3URL=http://documents.rs-components.com/techlib://itc_doclist_GB.htm?stockno=5048984&src-supplier=RSComponents, ComponentLink4Description=http://www.yageo.com/documents/recent/PYu-RC0603_51_RoHS_L_4.pdf?src-supplier=Avnet+Europe, ComponentLink4URL=http://www.yageo.com/documents/recent/PYu-RC0603_51_RoHS_L_4.pdf?src-supplier=Avnet+Europe, Composition="Thick Film", Contact Plating=Tin,Matte, Depth=0.8mm, Height=0.45mm, Item Type=Resistor, Lead Free="Lead Free", Length=1.6mm, Manufacturer Part Number=RC0603FR-0710RL, Military Standard=Not, Number of Pins=2, Packaging="Tape and Reel", Pricing 1="1=0.1, 10=0.046, 100=0.0187, 1000=0.0084, 2500=0.00729 (USD)", Radiation Hardening=No, REACH SVHC="No SVHC", Resistance=10R, Stock 1=10836596, Supplier 1=Digi-Key, Termination=SMD/SMT, Voltage Rating (DC)=50V, Width=0.8mm
R11: library part RC0402FR-0747KL, "RES 47K OHM 1% 1/16W 0402", Case Code (Imperial)=0402, Case Code (Metric)=1005, LCSC Part Number=C93943, Manufacturer=Yageo, Max Operating Temperature=155°C, Max Power Dissipation=63mW, Min Operating Temperature=-55°C, Package Quantity=1, Power Rating=62.5mW, Resistance=47kR, Resistance Tolerance=1%, Resistor Type="Thick Film", Temperature Coefficient=100ppm/°C, Voltage Rating=50V, Case/Package=0402, Category="Chip SMD Resistors", ComponentLink1Description=https://datasheet.ciiva.com/46412/1018594-46412839.pdf?src-supplier=Element14, ComponentLink1URL=https://datasheet.ciiva.com/46412/1018594-46412839.pdf?src-supplier=Element14, ComponentLink2Description=https://datasheet.ciiva.com/2453/pyu-r-int-thick-7-2453389.pdf?src-supplier=Digi-Key, ComponentLink2URL=https://datasheet.ciiva.com/2453/pyu-r-int-thick-7-2453389.pdf?src-supplier=Digi-Key, ComponentLink3Description=https://datasheet.ciiva.com/2453/pyu-r-int-thick-7-2453390.pdf?src-supplier=Digi-Key, ComponentLink3URL=https://datasheet.ciiva.com/2453/pyu-r-int-thick-7-2453390.pdf?src-supplier=Digi-Key, ComponentLink4Description=https://datasheet.ciiva.com/2453/pyu-r-int-thick-7-2453388.pdf?src-supplier=Digi-Key, ComponentLink4URL=https://datasheet.ciiva.com/2453/pyu-r-int-thick-7-2453388.pdf?src-supplier=Digi-Key, ComponentLink5Description=https://datasheet.ciiva.com/15189/getdatasheetpartid-323748-15189466.pdf?src-supplier=Verical, ComponentLink5URL=https://datasheet.ciiva.com/15189/getdatasheetpartid-323748-15189466.pdf?src-supplier=Verical, ComponentLink6Description=https://datasheet.ciiva.com/16793/pyu-rc0402-51-rohs-l-6-r-16793430.pdf?src-supplier=Future+Electronics, ComponentLink6URL=https://datasheet.ciiva.com/16793/pyu-rc0402-51-rohs-l-6-r-16793430.pdf?src-supplier=Future+Electronics, Construction=Rectangular, Depth=0.5mm, Features="Moisture Resistant", Height=0.016inch, Item Type=Resistor, Lead Free="Lead Free", Length=1mm, Manufacturer Part Number=RC0402FR-0747KL, Military Standard=Not, Number of Terminations=2, Packaging="Tape and Reel", Pricing 1="10000=0.00085, 20000=0.00087, 40000=0.00084, 60000=0.00083, 80000=0.00079, 100000=0.00078, 1000000=0.00076 (USD)", RoHS=Yes, RoHS Compliant=Yes, Series=RC, Size Code=0402, Stock 1=680000, Supplier 1=Avnet, Supplier Part Number 1=RC0402FR-0747KL, Termination=SMD/SMT, Tolerance=1%, Width=0.02inch
R12 R13 R14 R15 R16 R17 R18 R19 R20 R21 R22 R23 R24 R29 R30 R34 R35 R37 R38 R39: library part RC0402FR-070RL, "RES 0 OHM JUMPER 1/16W 0402", Case Code (Imperial)=0402, Case Code (Metric)=1005, LCSC Part Number=C106231, Manufacturer=Yageo, Max Operating Temperature=155°C, Max Power Dissipation=63mW, Min Operating Temperature=-55°C, Power Rating=62.5mW, Resistor Type="Thick Film", Supplier Part Number 1=603-RC0402FR-070RL, Temperature Coefficient=200ppm/°C, Tolerance=1%, Voltage Rating=50V, Case/Package=0402, ComponentLink1Description=https://datasheet.ciiva.com/8896/pyu-rc0402-51-rohs-l-6-8896149.pdf?src-supplier=Avnet, ComponentLink1URL=https://datasheet.ciiva.com/8896/pyu-rc0402-51-rohs-l-6-8896149.pdf?src-supplier=Avnet, ComponentLink2Description=https://datasheet.ciiva.com/16790/pyu-rc0402-51-rohs-l-6-r-16790444.pdf?src-supplier=Future+Electronics, ComponentLink2URL=https://datasheet.ciiva.com/16790/pyu-rc0402-51-rohs-l-6-r-16790444.pdf?src-supplier=Future+Electronics, Contact Plating=Tin,Matte, Features="Moisture Resistant", Height=0.35mm, Item Type=Resistors, Lead Free="Lead Free", Length=1mm, Manufacturer Part Number=RC0402FR-070RL, Mount="Surface Mount", Number of Terminations=2, Packaging="Tape and Reel", Pricing 1="1=0.10000, 10=0.01400, 50=0.01400, 100=0.00600, 1000=0.00300, 5000=0.00200, 10000=0.00100 (USD)", Radiation Hardening=No, Resistance=0R, RoHS=Yes, RoHS Compliant=Yes, Series=RC, Size Code=0402, Stock 1=8556842, Supplier 1=Mouser, Termination=SMD/SMT, Width=0.5mm